# Altium PCB xbowtie_PCB.PcbDoc (part 3 of 3)
Units mm, origin at the board's own origin, x right, y up, seen from the top; angles counter-clockwise.
Board outline 99 x 94 mm, 4 copper layers (Top Layer, GROUND, POWER, Bottom Layer), stack 1.369 mm thick; 127 components, 88 nets, 449 pads, 151 vias.
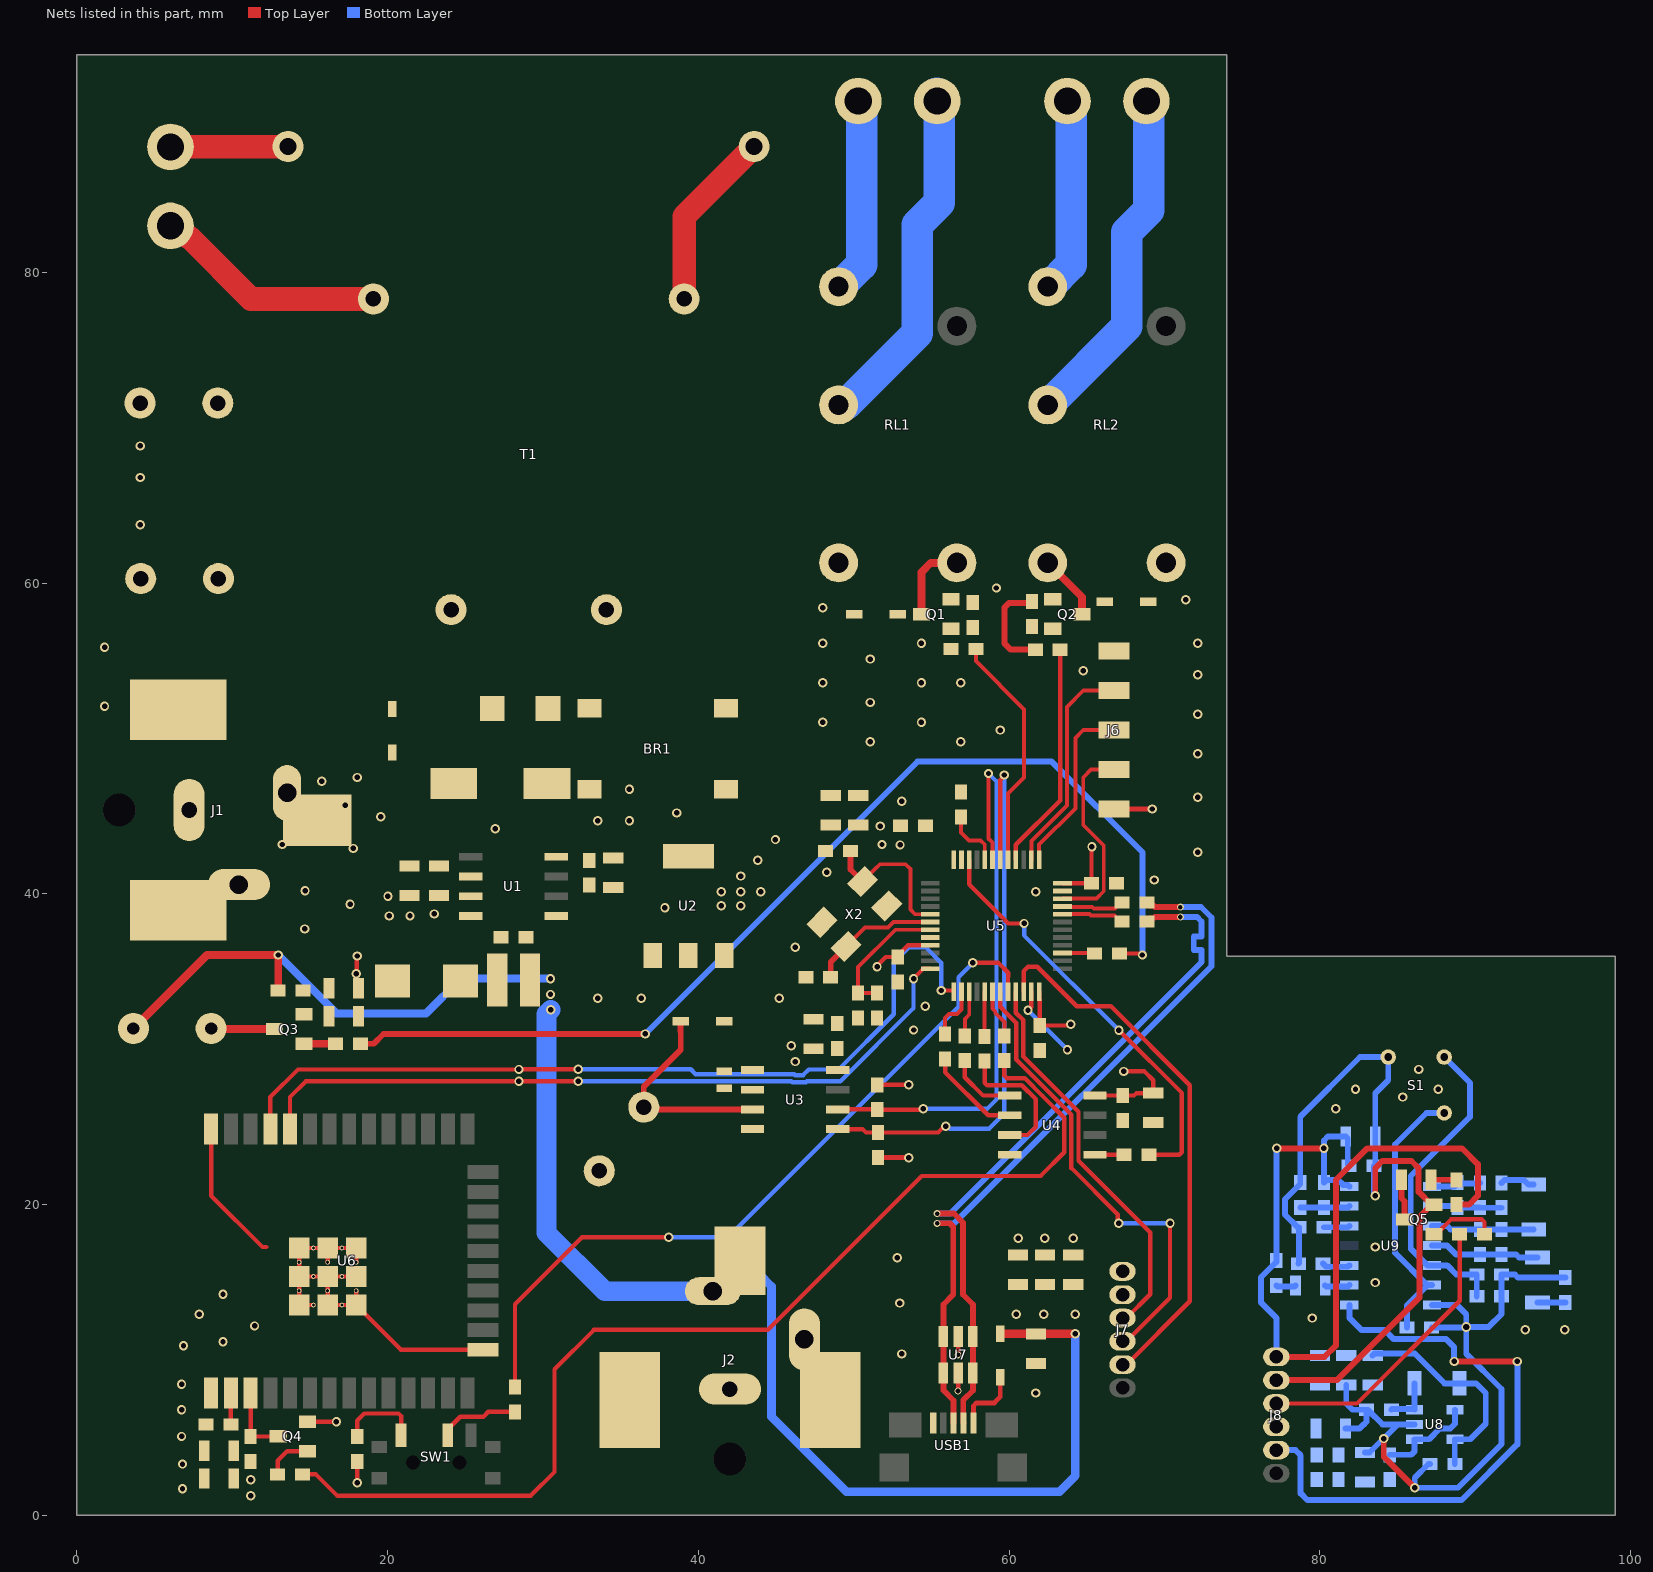
[diagram p4: the nets of this part, all layers, seen from the top]

## Part data (continued)
X1: library part "CRYSTAL 32768kHZ", "Crystal, 32.768 kHz, SMD, 1.6mm x 1mm, 12.5 pF, 20 ppm, ABS05 Series", Case/Package=SMD/SMT, ESR (Equivalent Series Resistance)=90kR, Frequency=32.768kHz, Frequency Tolerance=20ppm, Load Capacitance=12.5pF, Manufacturer=Abracon, Max Operating Temperature=85°C, Min Operating Temperature=-40°C, Operating Frequency="32.768 kHz", Package Quantity=3000, Supplier Part Number 1=535-11899-1-ND, Category=Crystals, ComponentLink1Description=https://datasheet.ciiva.com/23810/abs05-23810480.pdf?src-supplier=Newark, ComponentLink1URL=https://datasheet.ciiva.com/23810/abs05-23810480.pdf?src-supplier=Newark, ComponentLink2Description=https://datasheet.ciiva.com/6728/abs05-6728949.pdf?src-supplier=Digi-Key, ComponentLink2URL=https://datasheet.ciiva.com/6728/abs05-6728949.pdf?src-supplier=Digi-Key, ComponentLink3Description=https://datasheet.ciiva.com/6728/abs05-6728950.pdf?src-supplier=Digi-Key, ComponentLink3URL=https://datasheet.ciiva.com/6728/abs05-6728950.pdf?src-supplier=Digi-Key, ComponentLink4Description=https://datasheet.ciiva.com/16411/abs05-16411149.pdf?src-supplier=Future+Electronics, ComponentLink4URL=https://datasheet.ciiva.com/16411/abs05-16411149.pdf?src-supplier=Future+Electronics, Depth=1mm, Designed by=BERK, Height=0.02inch, Lead Free="Lead Free", Length=1.6mm, Manufacturer Part Number=ABS05-32.768KHZ-T, Mount="Surface Mount", Number of Pins=2, Packaging="Tape and Reel", Pricing 1="1=1,16000, 10=1,02500, 50=0,95760, 100=0,84630, 500=0,80180, 1000=0,66816 (USD)", Radiation Hardening=No, REACH SVHC="No SVHC", RoHS=Yes, RoHS Compliant=Yes, Series=ABS05, Series Resistance=90kR, Stock 1=180522, Supplier 1=Digi-Key, Termination=SMD/SMT, Tolerance=20ppm, Width=0.039inch
X2: library part "CRYSTAL 16MHz", "CRYSTAL 16.0000MHZ 20PF SMD", Case/Package=SMD/SMT, ESR (Equivalent Series Resistance)=50R, Frequency=16MHz, Frequency Stability=50ppm, Frequency Tolerance=30ppm, Load Capacitance=20pF, Manufacturer="ECS International", Max Operating Temperature=70°C, Min Operating Temperature=-20°C, Package Quantity=1, Supplier Part Number 1=XC1120CT-ND, Category=Crystals, ComponentLink1Description=https://datasheet.ciiva.com/853/ecx-53b-853408.pdf?src-supplier=Digi-Key, ComponentLink1URL=https://datasheet.ciiva.com/853/ecx-53b-853408.pdf?src-supplier=Digi-Key, ComponentLink2Description=https://datasheet.ciiva.com/853/ecx-53b-853406.pdf?src-supplier=Digi-Key, ComponentLink2URL=https://datasheet.ciiva.com/853/ecx-53b-853406.pdf?src-supplier=Digi-Key, ComponentLink3Description=https://datasheet.ciiva.com/853/ecx-53b-853407.pdf?src-supplier=Digi-Key, ComponentLink3URL=https://datasheet.ciiva.com/853/ecx-53b-853407.pdf?src-supplier=Digi-Key, Designed by=BERK, Height=0.033inch, Lead Free="Lead Free", Length=0.197inch, Manufacturer Part Number=ECS-160-20-30B-TR, Mount="Surface Mount", Packaging="Tape and Reel", Pricing 1="1=1,33000, 10=1,26800, 50=1,23900, 100=1,06200, 500=1,03250 (USD)", RoHS=Yes, RoHS Compliant=Yes, Series=ECX-53B, Stock 1=15303, Supplier 1=Digi-Key, Termination=SMD/SMT, Tolerance=50ppm, Width=0.126inch

## Via types
v1: diameter 0.6, hole 0.35, Top Layer to Bottom Layer, 144 vias
v2: diameter 0.45, hole 0.3, Top Layer to Bottom Layer, 6 vias
v3: diameter 0.635, hole 0.394, Top Layer to Bottom Layer, 1 vias

## Nets (pads, with @x,y where several pads share a name; then routed paths per layer and width w, separated by ;. In a path a pad name is that pad's centre, name@x,y a point inside that pad or via, vN(x,y) a via of type N, cw(c..) or ccw(c..) an arc to the next point about the centre after c; other vN are vias at no path point)
3V3DC: C6.2 C7.2 C12.2 C13.2 C14.2 C16.2 C17.2 C19.2 C20.2 C22.2 C23.2 C24.2 C25.2 C26.2 C28.2 C29.2 C30.2 C32.2 D3.2 J6.1 J7.1 R8.2 R9.2 R10.2 R36.1 U2.3 U3.8 U4.8 U5.9 U5.24 U5.36 U5.48 U6.2 U7.5 | length 31.5
  Top Layer w0.279: C24.2@9.906,5.842 U6.2@9.906,7.874 ; v1(17.97,34.861) 18.002,34.893 18.002,35.973 v1(18.034,36.005) ; v1(18.034,2.095) R10.2@18.034,3.48 ; v1(51.498,35.306) 51.498,35.382 52.057,35.941 C32.2@52.832,35.941 52.832,36.03 53.494,36.692 U5.9@54.932,36.692 ; v2(56.706,8.001) 56.706,8.096 56.718,8.108 U7.5@56.718,9.169 ; U5.24@61.932,33.692 61.932,33.242 61.976,33.198 C30.2@61.976,31.534 63.801,31.534 63.87,31.603 v1(63.957,31.603) ; U5.36@63.432,40.692 64.439,40.692 64.44,40.691 C29.2@65.303,40.691 65.303,43.002 v1(65.329,43.028) ; U4.8@65.532,27.02 C20.2@67.31,27.02 68.041,27.02 68.199,27.178 C19.2@69.278,27.178 69.278,28.003 68.707,28.575 v1(67.373,28.575)
  Top Layer w0.305: R8.2@51.511,27.711 53.535,27.711 v1(53.549,27.725) ; R9.2@51.562,23.038 v1@53.525,23.038 ; J6.1@66.739,45.466 v1(69.215,45.466)
  other v1: 11.176,1.27 11.176,2.286 60.579,17.843 62.293,17.843 64.135,17.843 53.543,23.019 46.228,29.21 45.974,30.226 41.465,39.243 42.735,39.243 41.465,40.132 42.735,40.132 44.005,40.132 42.735,41.148 43.815,42.164 44.958,43.497
3V3DC_S: C33.2 C43.2 C44.2 C45.2 C46.2 C47.2 J8.1 R32.2 R33.1 R35.2 RT1.2 U8.5 U9.14 | length 68.5
  Top Layer w0.381: J8.1@77.2,10.2 80.304,10.2 81.026,10.922 81.026,21.59 83.058,23.622 89.154,23.622 90.17,22.606 90.17,20.574 89.596,20 R35.2@88.8,20 ; v1(77.216,23.622) v1(80.264,23.622)
  Bottom Layer w0.381: J8.1@77.2,10.2 77.2,12.716 76.2,13.716 76.2,15.311 R32.2@77.2,16.311 ; R32.2@77.2,16.4 77.2,23.606 v1(77.216,23.622) ; C43.2@81.883,22.5 81.794,22.589 81.794,24.256 C44.2@81.666,24.384 80.518,24.384 80.264,24.13 v1(80.264,23.622) 80.264,21.59 R33.1@80.264,21.412 80.442,21.59 81.18,21.59 81.501,21.27 81.801,21.27 U9.14@81.9,21.17 ; C47.2@83.4,10.3 83.514,10.414 86.106,10.414 88.02,8.5 90.052,8.5 90.678,7.874 90.678,5.899 89.679,4.9 U8.5@88.7,4.9 ; C33.2@88.684,3.302 U8.5@88.684,4.884
5VDC: BZ1.1 C2.2 C4.2 C8.2 C11.2 C18.2 D2D2.1 J2.1 L1.2 U1.4 U2.1 | length 108.5
  Top Layer w0.508: BZ1.1@3.636,31.338 8.366,36.068 v1(12.954,36.068) C18.2@12.954,33.782
  Top Layer w0.559: D2D2.1@59.436,11.684 C11.2@61.722,11.684 v1(64.262,11.684)
  Bottom Layer w0.508: v1(12.954,36.068) 16.713,32.309 22.467,32.309 24.702,34.544 v1(30.48,34.544)
  Bottom Layer w0.559: J2.1@40.924,14.427 41.824,14.427 43.145,15.748 ; 43.942,15.494 44.704,14.732 44.704,6.35 49.53,1.524 63.246,1.524 64.262,2.54 v1(64.262,11.684)
  Bottom Layer w1.27: v1(30.493,32.537) 30.226,32.271 30.226,18.186 33.985,14.427 J2.1@40.924,14.427
  other v1: 30.48,33.528
12VDC: C1.2 C3.2 D2.2 D6.1 D7.1 J1.1 RL1.5 RL2.4 U1.7
  other v1: 20.091,38.583 21.438,38.583 22.987,38.71 20.015,39.853 17.78,42.926 13.208,43.18 19.558,44.958 17.272,45.72 15.748,47.244 18.034,47.498 48.006,58.42 71.374,58.928
AC_LINE_1: J3.1 R1.1 | length 7.6
  Top Layer w1.016: J3.1@6.02,88.082 J3.1@6.032,88.094 ; R1.1@13.576,88.094 R1.1@13.589,88.107
  Top Layer w1.524: J3.1@6.032,88.094 R1.1@13.576,88.094
AC_LINE_2: J3.2 T1.5 | length 15
  Top Layer w1.524: J3.2@6.02,83.002 6.419,83.002 7.157,82.264 7.236,82.264 11.205,78.295 T1.5@19.083,78.295
BUZZER: R6.1 R20.2 | length 68.4
  Top Layer w0.254: R20.2@67.094,36.164 68.39,36.164 68.486,36.068 v1(68.58,36.068)
  Top Layer w0.381: R6.1@18.237,30.353 19.101,30.353 19.736,30.988 v1(36.576,30.988)
  Bottom Layer w0.381: v1(36.576,30.988) 54.102,48.514 62.738,48.514 68.58,42.672 v1(68.58,36.068)
GND: BR1.4 C1.1 C2.1 C3.1 C4.1 C6.1 C7.1 C8.1 C9.2 C10.2 C11.1 C12.1 C13.1 C14.1 C15.2 C16.1 C17.1 C18.1 C19.1 C20.1 C21.1 C22.1 C23.1 C24.1 C25.1 C26.1 C27.1 C28.1 C29.1 C30.1 C31.1 C32.1 D1.A J1.2 J1.3 J2.2 J2.3 J6.5 J7.2 Q1.2 Q2.2 Q3.2 Q4.2 R3.1 R5.1 R11.1 R37.1 U1.6 U2.2 U3.4 U4.4 U5.8 U5.23 U5.35 U5.47 U6.1 U6.15 U6.38 U6.39 U7.2 USB1.5 X2.2 X2.4 | length 45.2
  Top Layer w0.279: U6.38@8.636,24.874 8.636,20.574 11.938,17.272 12.192,17.272 ; Q4.2@14.844,6.03 16.698,6.03 v1(16.7,6.032) ; U6.39@15.218,13.539 U6.39@14.301,13.539 U6.39@14.301,14.457 U6.39@14.301,15.374 ; U6.39@16.136,16.292 U6.39@16.136,17.209 ; U6.39@17.971,14.457 U6.39@17.971,13.539 ; U6.39@17.971,15.374 U6.39@17.053,15.374 U6.39@16.136,15.374 ; U6.39@17.971,16.292 U6.39@17.971,17.209 U6.39@17.053,17.209 U6.39@16.136,17.209 ; U6.15@26.146,10.659 20.851,10.659 U6.39@17.971,13.539 ; v2(56.718,10.328) U7.2@56.718,11.519 ; R3.1@57.45,58.958 R3.1@57.658,58.75 ; v1(61.214,32.512) 61.233,32.512 61.432,32.711 U5.23@61.432,33.692 ; U6.39@14.301,15.374 U6.39@15.218,15.374 U6.39@16.136,15.374 ; U6.39@14.301,15.374 U6.39@14.301,16.292 U6.39@14.301,17.209 U6.39@15.218,17.209 U6.39@16.136,17.209 ; U6.39@16.136,15.374 U6.39@16.136,14.457 U6.39@16.136,13.539 U6.39@17.053,13.539 U6.39@17.971,13.539
  Bottom Layer w0.279: v1(61.214,32.512) v1(63.754,29.972)
  other v1: 6.794,1.714 6.794,3.302 6.731,5.08 6.731,6.794 61.722,7.874 6.731,8.445 53.086,10.389 6.858,10.922 9.398,11.176 11.43,12.192 7.874,12.954 60.452,12.954 62.23,12.954 64.262,12.954 52.959,13.665 9.398,14.224 52.807,16.586 53.848,31.242 54.61,32.766 33.528,33.274 36.322,33.274 45.212,33.274 46.228,36.576 14.656,37.744 37.846,39.116 17.577,39.345 61.722,40.132 14.681,40.208 69.342,40.894 48.26,41.402 72.136,42.672 52.979,43.151 51.816,43.18 26.924,44.196 51.701,44.368 33.528,44.704 35.56,44.704 38.608,45.212 53.086,45.974 72.136,46.228 35.56,46.736 72.136,49.022 51.054,49.784 56.896,49.784 59.436,50.546 48.006,51.054 54.356,51.054 72.136,51.562 1.778,52.07 51.054,52.324 48.006,53.594 54.356,53.594 56.896,53.594 72.136,54.102 64.77,54.356 51.054,55.118 1.778,55.88 48.006,56.134 54.356,56.134 72.136,56.134 59.182,59.69 4.064,63.754 4.064,66.802 4.064,68.834
GND_S: C33.1 C37.1 C39.1 C40.1 C41.1 C42.1 C43.1 C44.1 C45.1 C46.1 C47.1 J8.2 Q5.2 R21.1 R23.2 R27.1 R30.1 R31.1 S1.3 U8.2 U9.7 | length 99.8
  Top Layer w0.381: J8.2@77.2,8.7 81.09,8.7 86.422,14.032 86.422,19.225 Q5.2@87.19,19.994 ; v1(83.566,20.574) 83.566,22.352 84.023,22.809 85.903,22.809 86.36,22.352 86.36,20.824 Q5.2@87.19,19.994 ; v1(84.115,4.945) 84.115,3.769 v1(86.106,1.778) ; Q5.2@87.34,19.994 Q5.2@87.19,19.994
  Bottom Layer w0.381: R30.1@78.611,16.2 78.664,16.253 R31.1@78.664,18.542 78.575,18.542 77.759,19.358 77.759,20.342 78.74,21.323 C42.1@78.74,21.412 78.74,25.654 82.586,29.5 S1.3@84.4,29.5 84.4,28.012 83.566,27.178 C44.1@83.566,24.384 83.566,22.583 C43.1@83.483,22.5 83.483,20.716 83.566,20.633 v1(83.566,20.574) ; C41.1@81.65,5.6 82.562,5.6 82.804,5.842 82.817,5.842 83,6.025 R21.1@83,6.8 ; C46.1@81.7,8.4 81.7,7.2 82.1,6.8 R21.1@83,6.8 ; C39.1@82.9,4.05 83.2,4.05 84.095,4.945 v1(84.115,4.945) 85.02,5.85 ; U8.2@86.1,5.85 85.02,5.85 ; C33.1@87.084,3.302 86.995,3.302 86.106,2.413 v1(86.106,1.778) 88.887,1.778 91.694,4.585 91.694,8.128 89.423,10.399 v3(89.423,12.132) ; C37.1@87.2,12.1 89.391,12.1 v3(89.423,12.132) ; U9.7@87.22,13.55 88.812,13.55 89.423,12.939 v3(89.423,12.132) ; R23.2@95.8,15.3 92.764,15.3 92.564,15.5 C40.1@91.7,15.5 R27.1@91.7,14.1 91.7,13.325 91.694,13.319 91.694,12.954 90.872,12.132 v3(89.423,12.132) ; R21.1@83,6.8 83.089,6.8 84.039,5.85 85.02,5.85
  other v1: 93.218,11.938 95.758,11.938 79.502,12.7 83.566,14.986 83.566,17.272 81.026,26.162 85.344,26.924 82.296,27.432 87.63,27.432 86.36,28.702
LED_DRIVER: J7.3 U5.21 | length 25.5
  Top Layer w0.279: U5.21@60.432,33.692 60.432,32.358 60.909,31.88 60.909,29.532 64.464,25.976 64.464,22.828 69.088,18.205 69.088,14.238 67.55,12.7 J7.3@67.3,12.7
LED_S: J8.3 R34.1 | length 18.8
  Top Layer w0.279: J8.3@77.2,7.2 82.384,7.2 89,13.816 R34.1@89,18.1
LIGT_1_GND: J4.1 RL1.3 | length 12.7
  Bottom Layer w2.032: RL1.3@49.022,79.09 49.076,79.09 50.5,80.514 50.5,90.558 50.292,90.766 J4.1@50.292,91.028
LIGT_1_VCC: J4.2 RL1.2 | length 23.1
  Bottom Layer w2.032: RL1.2@49.022,71.47 49.112,71.56 49.56,71.56 54.084,76.084 54.084,83.084 55.5,84.5 55.5,91.362 J4.2@55.334,91.528
LIGT_2_GND: J5.2 RL2.2 | length 22.3
  Bottom Layer w2.032: RL2.2@62.522,71.47 67.584,76.532 67.584,82.584 69,84 69,90.862 J5.2@68.834,91.028
LIGT_2_VCC: J5.1 RL2.3 | length 12.7
  Bottom Layer w2.032: RL2.3@62.522,79.09 62.576,79.09 64,80.514 64,90.558 63.792,90.766 J5.1@63.792,91.028
MCU_N: R17.1 U5.32 | length 4.1
  Top Layer w0.254: U5.32@63.432,38.692 63.455,38.715 63.951,38.715 63.952,38.716 65.164,38.716 65.267,38.612 66.798,38.612 67.183,38.227 R17.1@67.272,38.227
MCU_P: R18.1 U5.33 | length 4.1
  Top Layer w0.254: U5.33@63.432,39.192 63.455,39.169 63.951,39.169 63.952,39.168 65.351,39.168 65.455,39.064 66.808,39.064 67.188,39.444 R18.1@67.277,39.444
NetBR1_1: BR1.1 T1.9
NetBR1_2: BR1.2 T1.7
NetBR1_3: BR1.3 F1.1 | length 0
  Top Layer w1.143: F1.1@30.328,51.937 F1.1@30.342,51.952
NetBZ1_2: BZ1.2 Q3.3 | length 4.1
  Top Layer w0.508: BZ1.2@8.636,31.338 8.671,31.303 Q3.3@12.715,31.303
NetC5_1: C5.1 U1.1
NetC5_2: C5.2 D1.C L1.1 U1.8
NetC9_1: C9.1 C10.1 D2.1 F1.2
NetC15_1: C15.1 D3.1 U3.3 | length 13.6
  Top Layer w0.374: D3.1@38.856,31.813 38.856,31.158 38.862,31.152 38.862,29.972 36.486,27.596 C15.1@36.486,26.274 36.629,26.131 U3.3@43.478,26.131
NetC34_1: C34.1 C35.1 R22.1 U9.4 | length 7.1
  Bottom Layer w0.381: U9.4@87.22,17.36 88.191,17.36 88.751,16.8 90.896,16.8 92.619,16.8 92.819,16.6 C34.1@94,16.6
NetC34_2: C34.2 R23.1 | length 1.8
  Bottom Layer w0.381: C34.2@94,13.7 R23.1@95.8,13.7
NetC35_2: C35.2 C36.1 R22.2 U9.3 | length 6.6
  Bottom Layer w0.381: U9.3@87.22,18.63 88.191,18.63 88.421,18.4 C35.2@90.3,18.4 R22.2@91.7,18.4 ; R22.2@91.708,18.392 C36.1@93.769,18.392
NetC36_2: C36.2 R24.1 | length 2.3
  Bottom Layer w0.381: R24.1@91.7,21.4 91.89,21.59 93.121,21.59 93.419,21.292 C36.2@93.769,21.292
NetC37_2: C37.2 S1.1 U9.6 | length 17.5
  Bottom Layer w0.381: C37.2@85.6,12.1 85.6,13.5 U9.6@86.92,14.82 ; U9.6@87.22,14.82 U9.6@86.92,14.82 ; S1.1@88,25.9 86.86,25.9 84.836,23.876 84.836,16.904 U9.6@86.92,14.82
NetC38_1: C38.1 R24.2 R25.1 U9.2 | length 4.5
  Bottom Layer w0.381: U9.2@87.22,19.9 88.79,19.9 C38.1@88.867,19.823 90.277,19.823 R25.1@90.3,19.8 R24.2@91.7,19.8
NetC38_2: C38.2 R25.2 U9.1 | length 3.3
  Bottom Layer w0.381: U9.1@87.22,21.17 88.664,21.17 88.867,21.373 C38.2@88.867,21.423 88.931,21.359 90.259,21.359 R25.2@90.3,21.4
NetC39_2: C39.2 R26.1 R28.1 R29.1
NetC40_2: C40.2 R27.2 S1.2 U9.5 | length 20.9
  Bottom Layer w0.381: S1.2@88,29.5 89.662,27.838 89.662,25.654 85.852,21.844 85.852,17.158 86.92,16.09 U9.5@87.22,16.09 88.191,16.09 88.781,15.5 C40.2@90.1,15.5 R27.2@90.1,14.1
NetC42_2: C42.2 R33.2 U9.13 | length 3.2
  Bottom Layer w0.381: C42.2@78.74,19.812 81.812,19.812 U9.13@81.9,19.9
NetD2D2_2: D2D2.2 USB1.1 | length 4.3
  Top Layer w0.305: USB1.1@57.713,5.944 57.713,7.06 57.892,7.239 59.055,7.239 59.436,7.62 D2D2.2@59.436,8.884
NetD4_1: D4.1 U9.9 | length 1.6
  Bottom Layer w0.381: D4.1@80.344,14.8 80.412,14.732 81.812,14.732 U9.9@81.9,14.82
NetD4_2: D4.2 R32.1 | length 1.3
  Bottom Layer w0.381: R32.1@77.2,14.8 77.268,14.732 78.376,14.732 D4.2@78.444,14.8
NetD5_1: D5.1 Q5.3 | length 2.6
  Top Layer w0.374: D5.1@85.25,21.6 85.25,20.414 85.45,20.214 Q5.3@85.45,19.044
NetD5_2: D5.2 R35.1 | length 1.7
  Top Layer w0.374: D5.2@87.15,21.6 88.025,21.6 R35.1@88.8,21.6
NetD6_2: D6.2 Q1.3 RL1.4 | length 5.2
  Top Layer w0.508: Q1.3@54.356,58.008 54.356,60.706 54.96,61.31 RL1.4@56.642,61.31
NetD7_2: D7.2 Q2.3 RL2.5 | length 4.2
  Top Layer w0.508: RL2.5@62.484,61.31 64.699,59.095 Q2.3@64.699,58.008
NetJ7_5: J7.5 U5.22 | length 35.2
  Top Layer w0.279: U5.22@60.932,33.692 60.932,35.024 61.214,35.306 61.812,35.306 64.352,32.766 66.548,32.766 71.628,27.686 71.628,13.778 67.55,9.7 J7.5@67.3,9.7
NetJ8_5: J8.5 U9.8 | length 38.5
  Top Layer w0.381: v1(88.646,9.906) v1(92.71,9.906)
  Bottom Layer w0.381: J8.5@77.2,4.2 78.431,4.2 78.765,3.866 78.765,1.414 79.201,0.978 89.116,0.978 92.71,4.572 v1(92.71,9.906) ; U9.8@81.9,13.55 81.9,12.713 82.675,11.938 84.159,11.938 84.759,11.338 88.131,11.338 88.646,10.823 v1(88.646,9.906)
NetQ1_1: Q1.1 R2.2 R3.2
NetQ2_1: Q2.1 R4.2 R5.2 | length 6.2
  Top Layer w0.381: R4.2@61.468,55.722 60.102,55.722 59.69,56.134 59.69,58.42 60.008,58.737 61.392,58.737 R5.2@61.468,58.814
NetQ3_1: Q3.1 R6.2 | length 2
  Top Layer w0.508: Q3.1@14.605,30.353 R6.2@16.637,30.353
NetQ4_1: Q4.1 R16.2 | length 3.1
  Top Layer w0.279: R16.2@12.916,2.636 12.916,3.518 13.528,4.13 Q4.1@14.844,4.13
NetQ5_1: Q5.1 R34.2 | length 4.5
  Top Layer w0.279: Q5.1@87.34,18.094 87.49,18.094 88.446,19.05 90.424,19.05 90.6,18.874 R34.2@90.6,18.1
NetR1_2: R1.2 T1.1 | length 11.7
  Top Layer w1.524: T1.1@39.083,78.295 39.083,83.601 R1.2@43.589,88.107
NetR2_1: R2.1 U5.41 | length 15.3
  Top Layer w0.254: R2.1@57.857,55.756 57.857,54.981 60.96,51.878 60.96,47.498 59.932,46.47 U5.41@59.932,42.192
NetR4_1: R4.1 U5.40 | length 14.7
  Top Layer w0.279: U5.40@60.432,42.192 60.432,43.16 63.284,46.012 R4.1@63.284,55.722
NetR7_2: R7.2 SW1.2 | length 5.2
  Top Layer w0.279: SW1.2@23.864,5.148 23.864,5.548 24.666,6.35 26.162,6.35 26.474,6.662 R7.2@28.194,6.662
NetR10_1: R10.1 SW1.1 | length 5.3
  Top Layer w0.279: R10.1@18.034,5.08 18.034,6.096 18.494,6.556 20.7,6.556 20.864,6.393 SW1.1@20.864,5.148
NetR12_1: R12.1 U4.1 | length 4.4
  Top Layer w0.279: R12.1@57.15,29.268 57.15,28.194 58.324,27.02 U4.1@60.032,27.02
NetR13_1: R13.1 U4.3 | length 8.8
  Top Layer w0.279: R13.1@58.42,29.235 58.42,27.85 58.584,27.686 60.815,27.686 61.722,26.779 61.722,25.019 61.183,24.48 U4.3@60.032,24.48
NetR14_1: R14.1 U4.2 | length 6.2
  Top Layer w0.279: R14.1@55.88,29.388 55.88,28.524 58.654,25.75 U4.2@60.032,25.75
NetR15_1: R15.1 U4.5 | length 1.9
  Top Layer w0.279: U4.5@65.532,23.21 R15.1@67.399,23.21
NetR19_1: R19.1 U5.18 | length 3.1
  Top Layer w0.254: U5.18@58.932,33.692 58.932,32.611 59.106,32.437 59.106,32.334 59.69,31.75 R19.1@59.69,30.868
NetR20_1: R20.1 U5.27 | length 2.1
  Top Layer w0.254: U5.27@63.432,36.192 65.466,36.192 R20.1@65.494,36.164
NetR21_2: R21.2 RT1.1 U8.3 | length 3.2
  Bottom Layer w0.381: R21.2@84.6,6.8 84.658,6.858 86.042,6.858 U8.3@86.1,6.8 RT1.1@86.1,8.5
NetR26_2: R26.2 U8.1 U8.4 | length 6.4
  Bottom Layer w0.381: R26.2@84.5,3.9 85.877,3.9 86.1,4.123 U8.1@86.1,4.9 87.031,4.9 87.719,5.588 88.392,5.588 88.7,5.896 U8.4@88.7,6.8
NetR30_2: R30.2 U9.10 | length 1.8
  Bottom Layer w0.381: R30.2@80.211,16.2 80.409,16.002 81.812,16.002 U9.10@81.9,16.09
NetR31_2: R31.2 U9.12 | length 1.7
  Bottom Layer w0.381: R31.2@80.264,18.542 81.812,18.542 U9.12@81.9,18.63
NetR37_2: R37.2 U5.44 | length 3.9
  Top Layer w0.254: R37.2@56.896,44.958 56.896,43.942 57.404,43.434 58.171,43.434 58.432,43.173 U5.44@58.432,42.192
NetU3_1: U3.1 X1.2
NetU3_2: U3.2 X1.1
NRST: C21.2 R11.2 U5.7 | length 8.6
  Top Layer w0.254: R11.2@51.498,33.612 C21.2@50.272,33.612 50.272,35.286 52.678,37.692 U5.7@54.932,37.692
OSC_IN: C31.2 U5.5 X2.3 | length 10
  Top Layer w0.254: X2.3@50.568,40.79 51.403,41.625 ; 51.404,41.625 51.689,41.91 53.34,41.91 53.645,41.605 53.645,38.998 53.951,38.692 U5.5@54.932,38.692
  Top Layer w0.374: C31.2@49.784,42.768 49.784,41.574 X2.3@50.568,40.79
OSC_OUT: C27.2 U5.6 X2.1 | length 8.5
  Top Layer w0.254: X2.1@49.508,36.618 50.736,37.846 52.202,37.846 52.548,38.192 U5.6@54.932,38.192
  Top Layer w0.374: C27.2@48.514,34.64 48.514,35.624 X2.1@49.508,36.618
RTC_SCL: R8.1 U3.6 U5.43 | length 37.3
  Top Layer w0.279: U3.6@48.978,26.131 51.491,26.131 R8.1@51.511,26.111 54.415,26.111 v1(54.465,26.162) ; v1(58.674,47.752) 58.674,43.56 58.932,43.302 U5.43@58.932,42.192
  Bottom Layer w0.279: v1(54.465,26.162) 58.572,26.162 59.182,26.772 59.182,47.244 v1(58.674,47.752)
RTC_SDA: R9.1 U3.5 U5.42 | length 38.7
  Top Layer w0.279: U3.5@48.978,24.861 50.564,24.861 50.787,24.638 R9.1@51.562,24.638 ; R9.1@51.689,24.765 51.816,24.638 55.428,24.638 55.839,25.049 v1(55.926,25.049) ; U5.42@59.432,42.192 59.432,47.331 59.69,47.589 v1(59.69,47.655)
  Bottom Layer w0.279: v1(55.926,25.049) 56.013,25.049 56.17,24.892 58.725,24.892 59.69,25.857 v1(59.69,47.655)
"SENSOR ON/OFF": R7.1 U5.20 | length 48.8
  Top Layer w0.279: R7.1@28.194,8.262 28.194,13.589 32.512,17.907 v1(38.1,17.907) ; v1(57.658,35.56) 59.309,35.56 59.944,34.925 59.944,34.685 59.932,34.673 U5.20@59.932,33.692
  Bottom Layer w0.279: v1(38.1,17.907) 41.91,17.907 56.739,32.736 56.739,34.641 v1(57.658,35.56)
SWCLK: J6.3 U5.37 | length 11.5
  Top Layer w0.254: U5.37@61.932,42.192 61.932,43.173 64.262,45.503 64.262,50.038 64.77,50.546 J6.3@66.739,50.546
SWDIO: J6.2 U5.34 | length 12.9
  Top Layer w0.254: U5.34@63.432,39.692 65.612,39.692 66.091,40.171 66.091,43.121 64.77,44.442 64.77,47.498 65.278,48.006 J6.2@66.739,48.006
TDI: J6.4 U5.38 | length 14.2
  Top Layer w0.254: U5.38@61.432,42.192 61.432,43.398 63.729,45.695 63.729,52.045 64.77,53.086 J6.4@66.739,53.086
TEMP_ADC: C41.2 J8.4 R28.2 R29.2
TEMP_IN_CS: R14.2 U5.14 | length 3.4
  Top Layer w0.254: R14.2@55.88,30.988 55.88,32.004 56.134,32.258 56.642,32.258 56.932,32.548 U5.14@56.932,33.692
TEMP_IN_OT: R15.2 U5.46 | length 27.3
  Top Layer w0.279: U5.46@57.432,42.192 57.432,40.612 59.944,38.1 v1(60.96,38.1) ; v1(67.07,31.228) 71.12,27.178 71.12,23.374 70.956,23.21 R15.2@68.999,23.21
  Bottom Layer w0.279: v1(60.96,38.1) 60.966,38.094 60.966,37.332 v1(67.07,31.228)
TEMP_IN_SCLK: R12.2 U5.15 | length 2.9
  Top Layer w0.254: R12.2@57.15,30.868 57.15,31.958 57.432,32.24 U5.15@57.432,33.692
TEMP_IN_SIO: R13.2 U5.17 | length 2.8
  Top Layer w0.254: R13.2@58.42,30.836 U5.17@58.42,33.68
TEMPERATURE_ADC: J7.4 U5.19 | length 30.4
  Top Layer w0.279: U5.19@59.432,33.692 59.432,32.739 59.55,32.621 59.55,32.593 60.452,31.691 60.452,29.342 64.007,25.787 64.007,22.353 66.995,19.365 66.995,18.857 v1(67.056,18.796) ; J7.4@67.3,11.2 67.55,11.2 70.358,14.008 v1(70.358,18.796)
  Bottom Layer w0.279: v1(67.056,18.796) v1(70.358,18.796)
USB_N: R17.2 U7.1 U7.6 USB1.2 | length 46.4
  Top Layer w0.374: v2(55.372,19.424) 56.445,19.424 57.032,18.837 57.032,14.21 57.668,13.574 U7.1@57.668,11.519 U7.6@57.668,9.169 57.668,8.041 57.052,7.425 57.052,5.955 USB1.2@57.063,5.944 ; R17.2@68.872,38.227 69.079,38.434 69.299,38.434 69.387,38.522 v2@70.993,38.522
  Bottom Layer w0.374: v2(55.372,19.424) 56.206,19.424 72.39,35.608 72.39,36.195 72.39,36.382 71.882,36.382 71.882,37.264 72.39,37.264 72.39,37.592 72.39,38.227 72.095,38.522 71.023,38.522 v2(71.016,38.515)
USB_P: R18.2 U7.3 U7.4 USB1.3 | length 46.5
  Top Layer w0.374: v2(55.372,18.796) 56.185,18.796 56.404,18.577 56.404,14.21 55.768,13.574 U7.3@55.768,11.519 U7.4@55.768,9.169 55.768,8.048 56.424,7.391 56.424,5.955 USB1.3@56.413,5.944 ; R18.2@68.877,39.444 69.084,39.238 69.304,39.238 69.392,39.15 v2@70.993,39.15
  Bottom Layer w0.374: v2(55.372,18.796) 56.466,18.796 73.018,35.348 73.018,38.487 72.355,39.15 v2(71.016,39.15)
WIFI_EN: R16.1 R19.2 | length 70.8
  Top Layer w0.279: R16.1@14.516,2.636 15.38,2.636 16.746,1.27 29.21,1.27 30.734,2.794 30.734,9.398 33.274,11.938 44.464,11.938 54.37,21.844 62.026,21.844 63.55,23.368 63.55,25.597 62.179,26.968 61.004,28.143 59.856,28.143 59.69,28.309 R19.2@59.69,29.268
WIFI_OUT: Q4.3 R36.2 U6.3 | length 4.6
  Top Layer w0.279: U6.3@11.25,7.852 11.176,7.778 R36.2@11.176,5.08 Q4.3@12.954,5.08
WIFI_RXD: U5.12 U6.34 | length 47.9
  Top Layer w0.279: U6.34@13.716,24.874 13.716,26.924 14.724,27.932 v1(28.448,27.932) 28.456,27.94 v1(32.258,27.94) ; v1(53.848,34.544) 53.848,34.558 54.482,35.192 U5.12@54.932,35.192
  Bottom Layer w0.279: v1(32.258,27.94) 45.978,27.94 46.037,27.881 46.927,27.881 46.986,27.94 49.137,27.94 53.848,32.651 v1(53.848,34.544)
WIFI_TXD: U5.13 U6.35 | length 54.6
  Top Layer w0.279: U6.35@12.446,24.874 12.446,26.924 14.224,28.702 v1(28.448,28.702) 28.452,28.706 32.254,28.706 v1(32.258,28.71) ; v1(55.626,33.782) 56.422,33.782 56.432,33.772 U5.13@56.432,33.692
  Bottom Layer w0.279: v1(32.258,28.71) 39.502,28.71 39.814,28.397 46.168,28.397 46.226,28.339 46.738,28.339 47.101,28.702 49.022,28.702 52.578,32.258 52.578,35.56 53.594,36.576 54.61,36.576 55.626,35.56 v1(55.626,33.782)
pads on no net: J1. J2. J7.6 J8.6 RL1.1 RL2.1 SW1. SW1.3 U1.2 U1.3 U1.5 U3.7 U4.6 U4.7 U5.1 U5.2 U5.3 U5.4 U5.10 U5.11 U5.16 U5.25 U5.26 U5.28 U5.29 U5.30 U5.31 U5.39 U5.45 U6.4 U6.5 U6.6 U6.7 U6.8 U6.9 U6.10 U6.11 U6.12 U6.13 U6.14 U6.16 U6.17 U6.18 U6.19 U6.20 U6.21 U6.22 U6.23 U6.24 U6.25 U6.26 U6.27 U6.28 U6.29 U6.30 U6.31 U6.32 U6.33 U6.36 U6.37 U9.11 USB1. USB1.4

## Polygon pours and split planes (outlines as drawn)
GND on Top Layer "GND_L01_P032" (solid, remove dead copper, pour order 32): 0.508,73.406 0.508,26.162 28.194,26.162 28.194,0.508 73.406,0.508 73.406,59.436 72.644,60.198 12.192,60.198 11.684,60.706 11.684,73.406
GND_S on Top Layer "GND_S_L01_P035" (solid, remove dead copper, pour order 35): 75.184,34.9 75.692,35.408 98.298,35.408 98.4,35.306 98.4,0.737 98.273,0.61 75.616,0.61 75.184,1.041
GND on Top Layer "Top Layer-GND" (solid, pour order 27): 20.32,11.176 20.32,18.542 19.685,19.177 12.827,19.177 12.192,18.542 6.032,12.383 6.032,9.461 6.032,1.27 6.286,1.016 8.89,1.016 9.017,1.143 9.017,6.35 9.017,6.731 9.207,6.921 9.207,9.098 12.735,11.176
NetBR1_2 on Top Layer "NETBR1_2_L01_P000" (solid, remove dead copper, pour order 0): 22,60 22,56.5 30.5,56.5 36.3,50.7 43.4,50.7 43.4,53 36,53 31,58 26.86,58 25.96,60
NetBR1_1 on Top Layer "NETBR1_1_L01_P001" (solid, remove dead copper, pour order 1): 32.4,60.1 32.4,57.2 32.9,56.7 41.5,56.7 44.5,53.7 44.5,49.6 42.8,47.9 40.3,47.9 40.3,45.6 43.114,45.6 44.1,46.7 46.1,49.08 46.1,54.7 40.7,60.1
12VDC on Top Layer "12VDC_L01_P003" (solid, pour order 3): 20.6,50.1 19.8,50.1 19.4,49.7 19.4,49.2 19.1,48.9 13.2,48.9 12.1,47.8 12.1,42.8 13.2,41.7 18.3,41.7 21,44.4 21,49.7
3V3DC on Top Layer "Top Layer-3V3DC" (solid, pour order 30): 48.831,45.276 50.819,45.276 52.36,46.817 53.721,46.817 53.721,43.688 53.975,43.434 55.581,43.434 56.186,42.829 56.186,41.564 56.2,41.55 56.578,41.55 56.578,43.021 55.535,44.065 55.535,48.323 48.411,48.324 47.661,47.661 40.513,40.513 40.513,31.242 40.831,30.924 43.497,30.924 43.497,37.232 47.117,45.276
5VDC on Top Layer "5VDC_L01_P007" (solid, pour order 7): 28.45,36.4 28.3,36.3 28.3,31.852 31.09,31.852 31.242,32.004 31.242,34.544 31.598,34.9 37.7,34.9 38,35.2 38,37 37.7,37.3 35.7,37.3 35.5,37.5 35.5,40.9 35.1,41.3 32.397,41.3 32,42.26 32,48.4 31.8,48.6 28.7,48.6 28.6,48.5 28.6,45.9 29.309,45.9 29.7,45.509 29.7,42.1 30,41.9 31.582,41.9 31.724,41.758 31.852,41.567 31.852,39.662 31.976,39.6 34.4,39.6 34.4,36.4
12VDC on Top Layer "12VDC_L01_P020" (solid, pour order 20): 68.072,57.912 67.818,58.166 67.818,62.738 68.326,63.246 72.136,63.246 72.39,62.992 72.39,58.42 71.882,57.912
12VDC on Top Layer "12VDC_L01_P019" (solid, pour order 19): 50.8,57.15 51.054,57.404 51.054,62.992 50.8,63.246 47.371,63.246 47.117,62.992 47.117,57.404 47.371,57.15
3V3DC on Top Layer "3V3DC_L01_P015" (solid, pour order 15): 65.151,18.669 59.563,18.669 59.563,16.447 59.944,16.066 65.278,16.066 66.294,15.05 68.58,15.05 68.707,15.176 68.707,16.383 67.882,17.209 65.341,17.209 65.341,18.352
NetC9_1 on Top Layer "NETC9_1_L01_P002" (solid, pour order 2): 27,50.6 27.7,50.6 28.2,51.1 28.2,52.6 27.7,53.1 16.5,53.1 11,58.6 11,72.6 10.2,73.4 8.1,73.4 7.3,72.6 7.3,58.8 15.5,50.6
GND on Bottom Layer "GND_L04_P034" (solid, remove dead copper, pour order 34): -0.554,73.148 -0.554,25.904 27.132,25.904 27.132,0.25 73.614,0.25 73.614,57.908 71.328,60.194 10.876,60.194 10.622,60.448 10.622,73.148
GND_S on Bottom Layer "GND_S_L04_P037" (solid, remove dead copper, pour order 37): 75.184,34.9 75.692,35.408 98.298,35.408 98.4,35.306 98.4,0.737 98.273,0.61 75.616,0.61 75.184,1.041
3V3DC on POWER (split plane): 11.938,60.452 45.72,60.452 45.72,65.278 73.49,65.278 73.49,36 73.499,35.9 73.528,35.805 73.531,35.8 73.531,0.51 0.51,0.51 0.51,6.35 8.636,6.35 8.636,25.908 0.51,25.908 0.51,73.406 11.938,73.406
5VDC on POWER (split plane): 32.891,35.909 32.891,31.655 32.353,31.117 27.178,31.117 27.103,31.109 27.051,31.094 26.999,31.109 26.924,31.117 26.849,31.109 26.777,31.088 26.711,31.052 26.653,31.005 22.955,27.307 2.161,27.307 2.161,33.623 2.445,33.907 4.667,33.907 5.205,33.369 5.205,29.718 5.213,29.643 5.234,29.571 5.27,29.505 5.317,29.447 5.571,29.193 5.629,29.146 5.695,29.11 5.767,29.089 5.842,29.081 16.51,29.081 16.585,29.089 16.657,29.11 16.723,29.146 16.781,29.193 24.035,36.447 32.353,36.447
3V3DC_S on POWER (split plane): 98.49,0.51 75.567,0.51 75.567,35.49 98.49,35.49
12VDC on POWER (split plane): 72.998,62.758 72.998,57.76 70.484,57.76 64.272,63.972 64.239,63.994 64.2,64.002 56.28,64.002 56.241,63.994 56.208,63.972 48.98,56.744 44.342,56.744 44.303,56.736 44.27,56.714 25.313,37.757 16.787,37.757 12.04,42.504 12.04,49.93 12.04,51.698 21.698,51.698 21.698,44.542 20.028,42.872 20.006,42.839 19.998,42.8 19.998,40.9 20.006,40.861 20.028,40.828 20.328,40.528 20.361,40.506 20.4,40.498 26.1,40.498 26.139,40.506 26.172,40.528 50.642,64.998 70.758,64.998
GND on GROUND (split plane): 73.277,36.068 73.277,0.51 0.51,0.51 0.51,93.49 73.277,93.49
GND_S on GROUND (split plane): 98.49,0.51 75.059,0.51 75.059,35.49 98.49,35.49

## Keep-outs
Keep-Out Layer:
  the board outline again, w0.254

## Other copper
Top Layer:
  region net 3V3DC: 9.334,6.35 9.207,6.223 9.207,0.953 9.398,0.762 11.684,0.762 11.938,1.016 11.938,3.048 11.938,3.81 11.684,4.064 10.465,4.064 10.465,6.35
  region net 3V3DC: 47.244,30.734 45.72,30.734 45.466,30.48 45.466,28.448 45.657,28.258 49.721,28.258 50.101,28.638 50.101,30.29 49.716,30.675
  region net LED_S: 76.149,7.849 75.743,7.214 76.149,6.553 78.257,6.553 78.257,7.849
  region net GND_S: 76.149,9.347 75.743,8.712 76.149,8.052 78.257,8.052 78.257,9.347
  region net 3V3DC_S: 76.124,10.846 75.717,10.211 76.124,9.55 78.232,9.55 78.232,10.846
  region net 12VDC: 19.775,40.4 19.355,39.98 19.355,38.1 19.672,37.782 22.987,37.782 24.604,39.4 26.3,39.4 26.4,39.5 26.4,40.3 26.3,40.4
  region net 3V3DC: 17.526,35.179 17.399,35.052 17.399,31.432 17.526,31.305 18.415,31.305 18.542,31.432 18.542,34.989 18.351,35.179
  region net NetD7_2: 63.881,57.531 64.135,57.277 65.532,57.277 65.786,57.531 65.786,58.166 65.913,58.293 66.802,58.293 66.929,58.42 66.929,59.055 66.675,59.309 64.135,59.309 63.881,59.055 63.881,58.674 63.881,59.182 63.881,58.674
  region net NetQ2_1: 60.706,59.563 60.579,59.436 60.579,58.293 60.706,58.166 63.5,58.166 63.627,58.293 63.627,59.436 63.5,59.563
  region net NetD6_2: 52.197,58.674 52.07,58.547 52.07,57.404 52.197,57.277 54.991,57.277 55.118,57.404 55.118,58.547 54.991,58.674
  region net NetQ1_1: 58.293,57.658 58.166,57.785 55.626,57.785 55.499,57.658 55.499,55.245 55.626,55.118 56.896,55.118 57.023,55.245 57.023,56.261 57.277,56.515 58.166,56.515 58.293,56.642
  region net NetU3_2: 41.148,27.94 40.894,27.686 40.894,27.178 41.148,26.924 44.196,26.924 44.45,27.178 44.45,27.686 44.196,27.94
  region net NetU3_1: 41.148,29.21 40.894,28.956 40.894,28.448 41.148,28.194 44.196,28.194 44.45,28.448 44.45,28.956 44.196,29.21
  region net NetC5_1: 28.4,37.7 28.3,37.6 28.3,36.8 28.4,36.7 29.4,36.7 29.6,36.9 29.6,37.5 30.2,38.1 31.5,38.1 31.7,38.3 31.7,38.8 31.6,39 29.9,39
  region net NetC5_2: 24.5,38.9 26.2,38.9 26.3,38.8 26.3,37.8 26.4,37.7 27.9,37.7 28,37.6 28,32.8 27.8,32.6 23.5,32.6 23.3,32.8 23.3,35.6 23.6,35.8 24.2,35.8 24.4,36 24.4,38.8
  region net NetBR1_3: 29.2,52.7 29.2,51.1 29.5,50.8 33.7,50.8 34,51.1 34,52.7 33.7,53 29.5,53
Bottom Layer:
  region net GND: 12.7,19.05 9.652,16.002 14.478,11.176 22.098,11.176 24.13,9.144 29.718,9.144 30.48,9.906 24.13,9.906 24.13,14.986 20.066,19.05
  region net NetC39_2: 79.375,1.397 85.026,1.397 85.281,1.651 85.281,2.73 85.026,2.984 79.438,2.984 79.184,2.73 79.184,1.651
  region net TEMP_ADC: 79.375,3.175 81.788,3.175 81.915,3.302 81.915,4.572 81.788,4.699 80.518,4.699 80.366,4.851 80.366,6.35 76.327,6.35 76.2,6.223 76.2,5.08 78.994,5.08 79.375,4.699
  region net GND_S: 76.2,9.322 78.816,9.322 79.248,8.89 84.074,8.89 84.328,8.636 84.328,7.874 84.201,7.747 79.248,7.747 78.943,8.052 76.403,8.052 76.2,8.255
  region net 3V3DC_S: 84.074,11.176 76.454,11.176 76.2,10.922 76.2,9.55 84.226,9.55 84.582,9.906 84.582,10.922
  region net 5VDC: 43.307,16.129 39.37,16.129 38.227,14.986 38.227,14.202 38.75,12.939 38.862,12.827 43.307,12.827 44.45,15.586 44.45,15.748
  region net 5VDC: 29.21,31.369 29.591,30.988 30.861,30.988 31.242,31.369
  region net 5VDC: 28.321,35.027 28.092,34.798 28.092,34.29 28.321,34.061
  region net 5VDC: 28.321,35.369 28.321,31.331 28.397,31.255 31.775,31.255 31.915,31.394 31.915,35.369 31.902,35.382 28.332,35.395
GROUND (plane layer: these items are gaps in the copper):
  rectangle: 66.243,13.411 68.453,14.884
  rectangle: 15.879,13.208 16.42,13.821
  rectangle: 16.764,16.002 17.272,16.51
  rectangle: 16.764,14.224 17.272,14.732
  rectangle: 15.918,14.986 16.51,15.602
  rectangle: 14.986,14.224 15.494,14.732
  rectangle: 14.986,16.002 15.494,16.51
  rectangle: 76.108,7.619 78.295,9.635
  lines w0.762: 73.66,0 0,0 0,93.726 0.254,93.98 73.66,93.98 73.66,36.068 73.66,0.254 ; 74.168,0.254 74.168,36.576 ; 74.676,0.508 74.676,35.56
POWER (plane layer: these items are gaps in the copper):
  rectangle: 0.254,6.35 8.636,25.908
  rectangle: 45.212,65.278 73.914,74.422
  rectangle: 11.938,60.452 45.72,74.168
  rectangle: 0.508,73.406 73.66,93.726
  lines w0.2: 11.938,42.462 16.745,37.655 25.355,37.655 44.342,56.642 49.022,56.642 56.28,63.9 64.2,63.9 70.442,57.658 73.1,57.658 73.1,62.8 70.8,65.1 50.6,65.1 26.1,40.6 20.4,40.6 20.1,40.9 20.1,42.8 21.8,44.5 21.8,51.8 11.938,51.8 11.938,49.93 11.938,42.462
  lines w0.762: 26.924,30.734 23.114,26.924 1.778,26.924 1.778,33.782 2.286,34.29 4.826,34.29 5.588,33.528 5.588,29.718 5.842,29.464 16.51,29.464 23.876,36.83 32.512,36.83 33.274,36.068 33.274,31.496 32.512,30.734 30.48,30.734 27.178,30.734
  lines w1.27: 74.168,0.254 74.168,35.814 ; 74.93,0.254 74.93,35.814

## Silkscreen, mask and mechanical layers (free items; w line width, h text height)
Top Overlay:
  drawing of 6083 lines, arcs and shapes, not listed
  text "Wireless Security Det" at 72.806,17.828 h1.2 r90
  text "Wireless Security Det" at 97.92,7.508 h1.2 r90
  text "PROGRAM" at 71.402,6.932 h1.2 r90
  text "SENSOR CARD" at 87.398,1.394 h1
Bottom Overlay:
  text "4" at 91.618,3.454 h0.8
  text "3" at 92.888,3.454 h0.8
  text "2" at 94.183,3.454 h0.8
  text "1" at 95.275,3.454 h0.8
  text "4" at 80.162,0.584 h0.8
  text "3" at 81.686,0.584 h0.8
  text "2" at 83.363,0.584 h0.8
  text "1" at 84.785,0.584 h0.8
Drill Drawing:
  the board outline again, w1.2

## Text inside footprints (layer, text, board x,y; h text height)
BR1: Top Overlay "~" at 41.504,46.201 h1.52 r90; Top Overlay "~" at 41.404,51.301 h1.52 r90
J7: Top Overlay "1" at 69.647,17.932 h1.52 r90
J8: Bottom Overlay "1" at 74.346,12.548 h1.52 r270
S1: Top Overlay "G" at 85.077,30.301 h1; Top Overlay "S" at 88.877,28.201 h1; Top Overlay "D" at 86.254,25.254 h1
T1: Top Overlay "INPUT" at 14.148,84.201 h1 r180; Top Overlay "OUTPUT" at 39.837,53.049 h1